# Altium PCB CM5_RP2040_MZM.PcbDoc (part 2 of 5)
Units mil, origin at the board's own origin, x right, y up, seen from the top; angles counter-clockwise.
Board outline 4724.41 x 3543.31 mil, 4 copper layers (Top Layer, GND L2, GND L3, Bottom Layer), stack 62.992 mil thick; 227 components, 122 nets, 905 pads, 3083 vias.
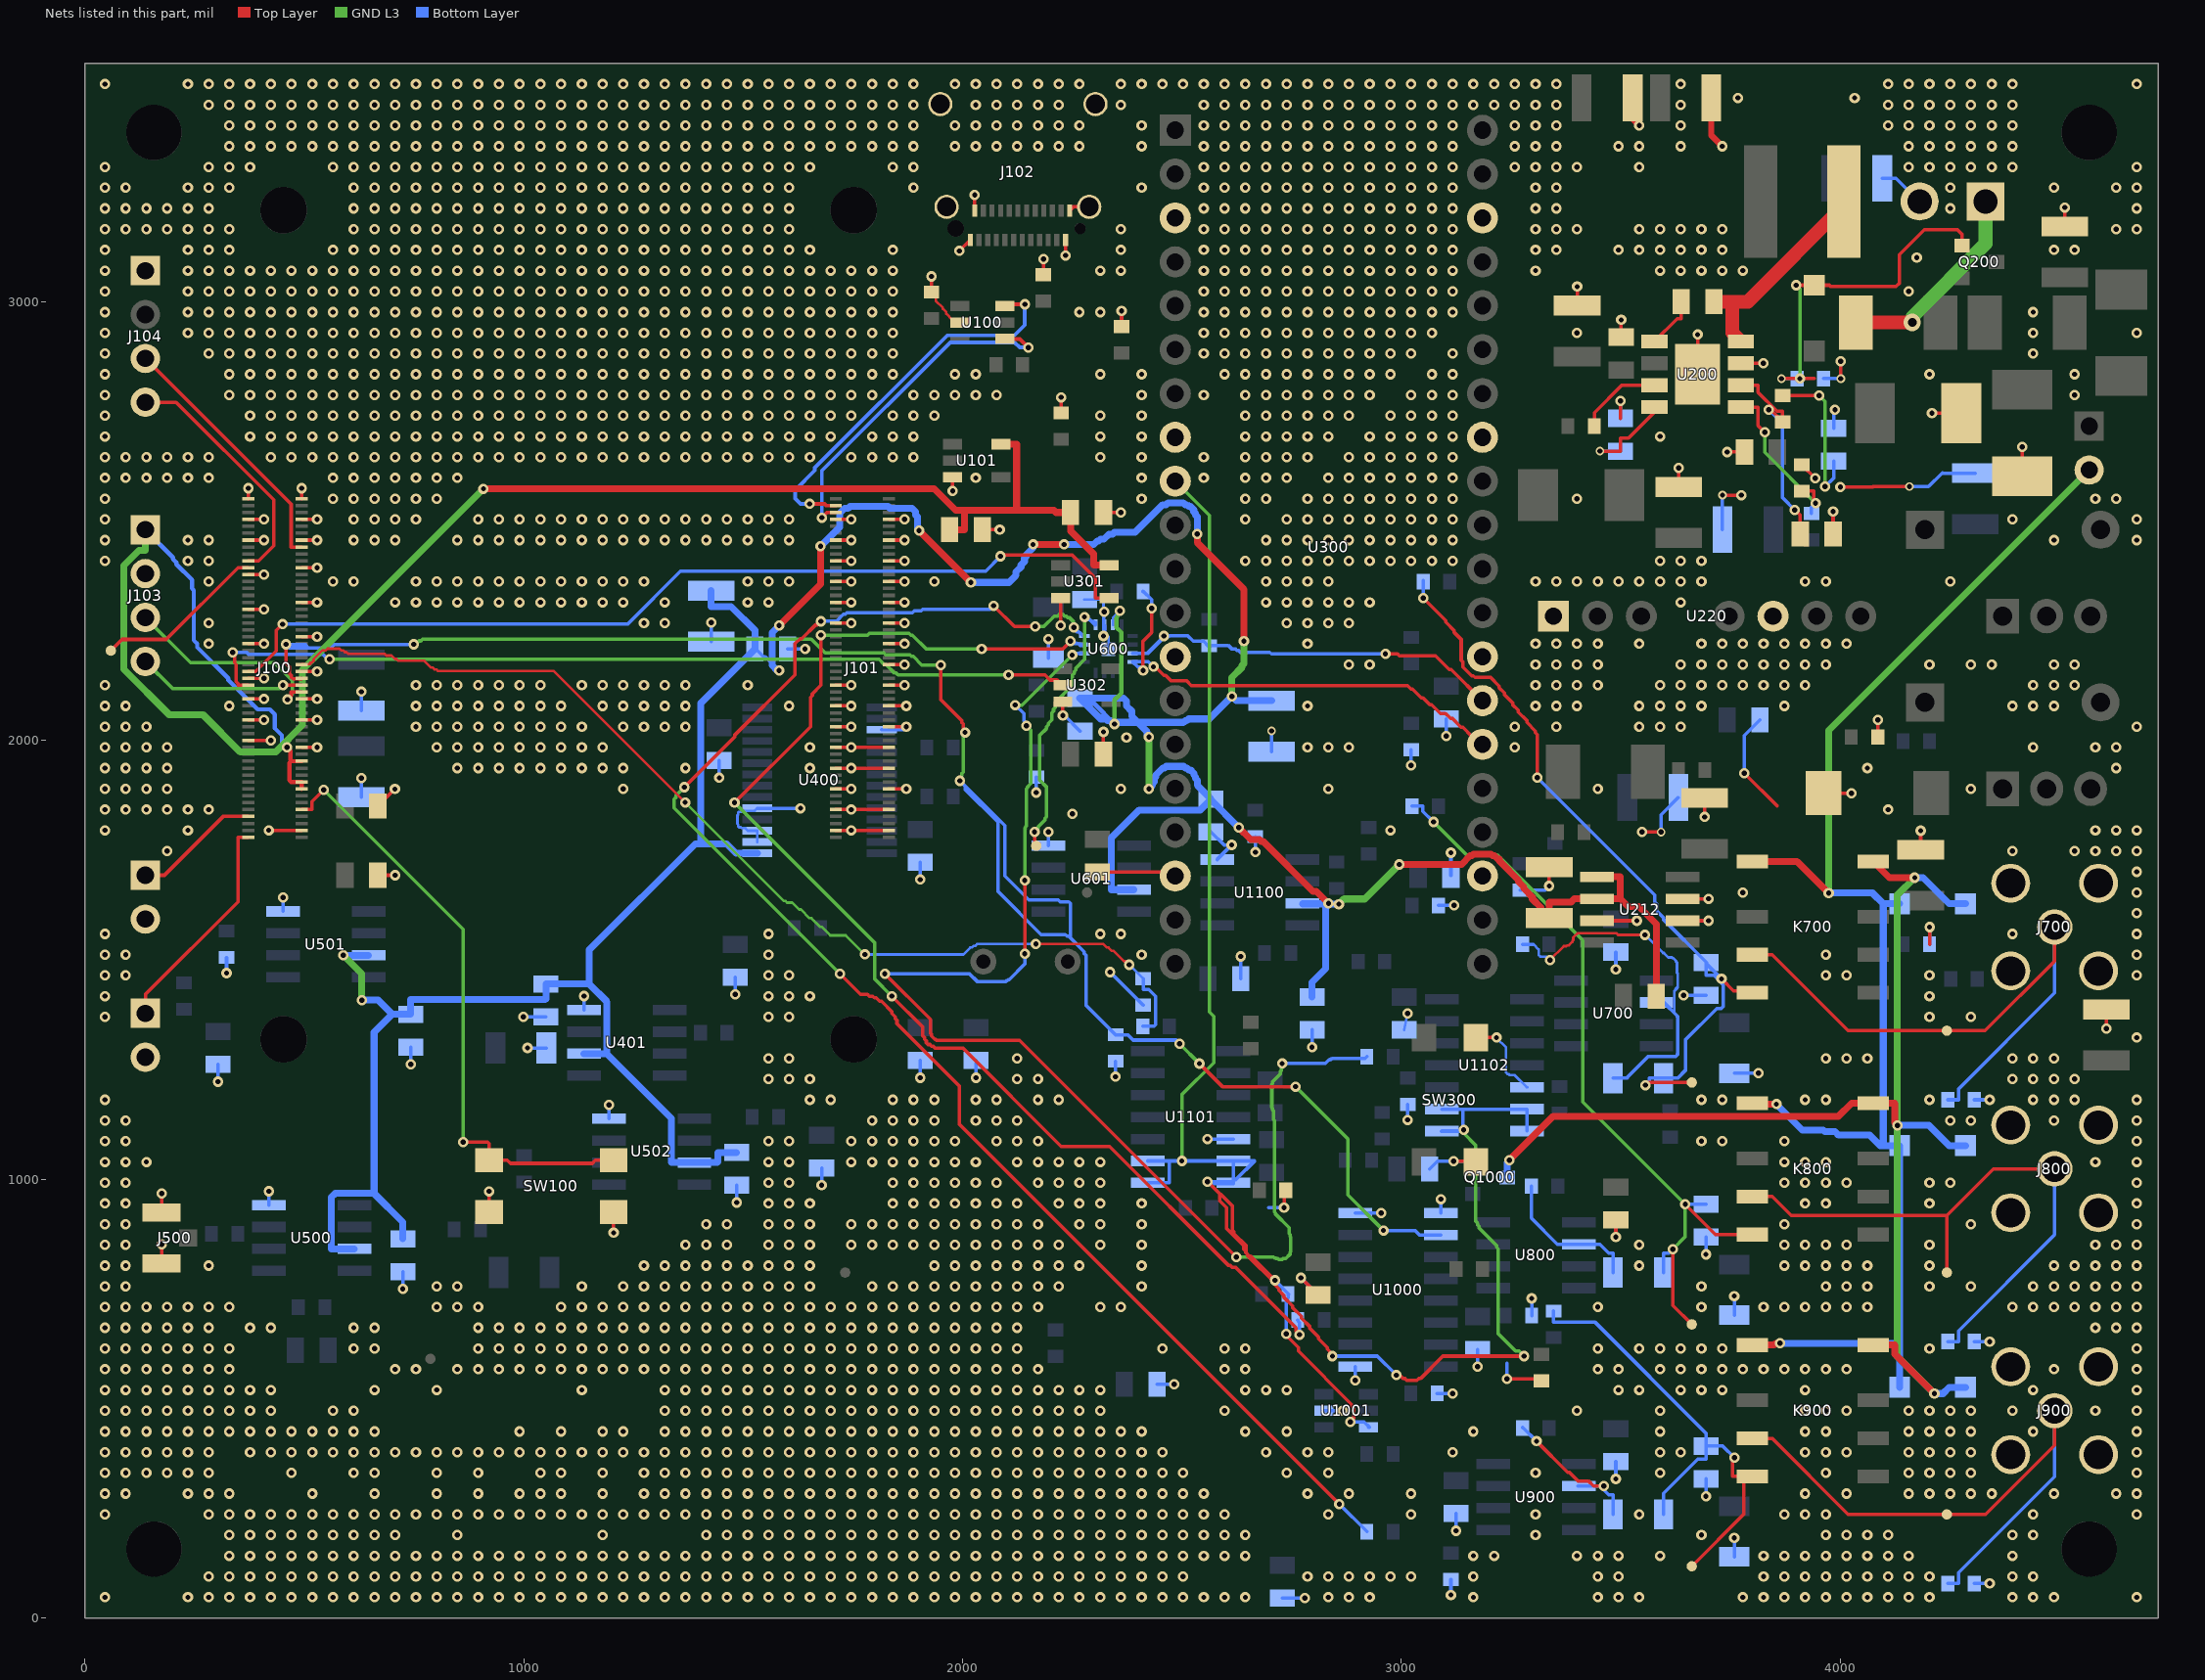
[diagram p4: the nets of this part, all layers, seen from the top]

## Via types
v1: diameter 23.62, hole 11.81, Top Layer to Bottom Layer, tented both sides, 3043 vias
v2: diameter 39.37, hole 19.68, Top Layer to Bottom Layer, tented both sides, 22 vias
v3: diameter 19.68, hole 11.81, Top Layer to Bottom Layer, tented both sides, 14 vias
v4: diameter 21.65, hole 11.81, Top Layer to Bottom Layer, tented both sides, 4 vias

## Nets (pads, with @x,y where several pads share a name; then routed paths per layer and width w, separated by ;. In a path a pad name is that pad's centre, name@x,y a point inside that pad or via, vN(x,y) a via of type N, cw(c..) or ccw(c..) an arc to the next point about the centre after c; other vN are vias at no path point) (continued)
AVDD5: C215.1 C216.2 C402.1 C403.1 C407.1 C501.1 C503.1 C506.1 C600.1 C601.1 C605.1 C1100.1 U212.1 U212.2 U400.1 U401.2 U500.7 U501.7 U502.7 U600.7 U601.7 U1100.7 | length 9522
  Top Layer w15.75: v1(1581.85,2261.81) 1676.34,2356.3 v1(1676.34,2442.91) ; v1(1900.75,2478.35) v1(2018.86,2360.24) ; v1(2160.59,2446.85) v1(2231.46,2446.85) ; v1(2534.61,2470.47) 2534.61,2450.79 2640.91,2344.49 v1(2640.91,2226.38) ; v1(2629.02,1801.77) 2656.57,1774.21 2676.26,1774.21 2680.2,1770.28 2684.13,1770.28 2798.31,1656.1 2806.18,1656.1 v1(2833.74,1628.54) ; v1(2995.08,1717.52) 3136.81,1717.52 3156.5,1737.2 3160.43,1737.2 3164.37,1741.14 3203.74,1741.14 3207.68,1737.2 3211.61,1737.2 3219.49,1729.33 3223.43,1729.33 3223.43,1725.39 3266.73,1682.09 3266.73,1678.15 3278.54,1666.34 3278.54,1662.4 3298.23,1642.72 3298.23,1638.78 3317.91,1619.09 3317.91,1615.16 3337.6,1595.47 C215.1@3336.61,1595.47 3336.61,1631.96 3386.42,1631.96 3393.63,1639.17 U212.2@3445.87,1639.17 3498.1,1639.17 ; U212.1@3445.87,1689.17 3498.1,1689.17 3498.1,1639.17 ; C216.2@3580.71,1417.32 3580.71,1581.57 3540.9,1621.38 3515.89,1621.38 3498.1,1639.17
  GND L3 w9.84: v1(2346.2,2037.4) 2346.2,2092.52 2361.95,2108.27 2361.95,2246.06 2350.14,2257.87 2350.14,2277.56 v1(2358.07,2295.28)
  GND L3 w15.75: v1(589.02,1510.43) 630.9,1468.55 v1(630.9,1408.2) ; v1(2424.53,1889.76) v1(2424.53,2007.87) ; v1(2613.35,2100.39) 2613.35,2143.7 2636.97,2167.32 2636.97,2171.26 2640.91,2175.2 v1(2640.91,2226.38) ; v1(2857.28,1626.97) 2869.09,1638.78 2916.34,1638.78 v1(2995.08,1717.52)
  Bottom Layer w5.91: U600.7@2342.32,2263.78 2342.32,2279.53 v1(2358.07,2295.28)
  Bottom Layer w7.87: C402.1@1526.73,2208.66 1526.73,2210.63 1546.42,2190.94 1550.35,2190.94 v1(1581.85,2159.45) ; C600.1@2267.46,2096.46 2266.89,2096.46 2286.57,2076.77 2290.51,2076.77 2310.2,2057.09 2314.13,2057.09 2329.88,2041.34 2333.82,2041.34 2337.76,2037.4 v1@2345.63,2037.4
  Bottom Layer w9.84: C600.1@2267.46,2096.46 2279.27,2084.65 2298.96,2084.65 v1(2346.2,2037.4)
  Bottom Layer w15.75: v1(589.02,1510.43) U501.7@646.26,1510.43 ; U500.7@613.98,841.14 561.74,841.14 561.74,958.85 570.57,967.68 659,967.68 ; v1(630.9,1408.2) 667.92,1408.2 700.13,1375.98 ; C501.1@724.41,864.17 724.41,902.28 659,967.68 ; U401.2@1137.4,1286.02 1184.19,1286.02 1189.57,1286.02 ; C403.1@1426.93,2341.54 1426.93,2305.05 1472.73,2305.05 1526.73,2251.05 1526.73,2210.64 C402.1@1526.73,2208.66 1402.95,2084.88 1402.95,1764.36 ; C506.1@1485.04,1061.02 1442.65,1061.02 1442.65,1039.63 1441.01,1037.99 U502.7@1388.78,1037.99 1336.55,1037.99 1336.55,1139.05 1189.57,1286.02 ; U400.1@1532.17,1743.11 1483.87,1743.11 1462.62,1764.36 1402.95,1764.36 ; v1(1581.85,2159.45) 1577.91,2159.45 1566.1,2171.26 1566.1,2246.06 v1(1581.85,2261.81) ; v1(1676.34,2442.91) 1719.65,2486.22 1719.65,2517.72 1731.46,2529.53 1739.33,2529.53 1743.27,2533.46 1829.88,2533.46 1833.82,2529.53 1885,2529.53 1892.87,2521.65 1892.87,2513.78 1896.81,2509.84 1896.81,2482.28 v1(1900.75,2478.35) ; v1(2018.86,2360.24) 2105.47,2360.24 2121.22,2375.98 2121.22,2383.86 2133.03,2395.67 2133.03,2399.61 2140.91,2407.48 2140.91,2415.35 2144.84,2419.29 2144.84,2423.23 2160.59,2438.98 v1(2160.59,2446.85) ; v1(2231.46,2446.85) 2298.39,2446.85 2306.26,2454.72 2310.2,2454.72 2314.13,2458.66 2322.01,2458.66 2333.82,2470.47 2341.69,2470.47 2345.63,2474.41 2392.87,2474.41 2455.87,2537.4 2463.74,2537.4 2467.68,2541.34 2503.11,2541.34 2507.05,2537.4 2510.98,2537.4 2514.92,2533.46 2518.86,2533.46 2526.73,2525.59 2526.73,2521.65 2530.67,2517.72 2530.67,2513.78 2534.61,2509.84 v1(2534.61,2470.47) ; C600.1@2266.89,2096.46 2314.13,2049.21 2325.94,2049.21 2329.88,2045.28 2337.76,2045.28 2341.69,2041.34 2503.11,2041.34 2507.05,2045.28 2510.98,2045.28 2514.92,2049.21 2562.17,2049.21 v1(2613.35,2100.39) 2622.99,2090.75 C601.1@2704.06,2090.75 ; C600.1@2267.46,2096.46 2366.7,2096.46 2373.35,2089.81 2373.35,2079.72 2373.35,2078.74 2385.16,2066.93 2385.16,2055.12 2420.59,2019.68 2420.59,2011.81 v1(2424.53,2007.87) ; U601.7@2390.55,1660.04 2338.32,1660.04 2338.32,1777.63 2402.36,1841.67 2541.55,1841.67 C605.1@2566.02,1866.14 ; v1(2424.53,1889.76) 2432.4,1897.64 2432.4,1901.57 2436.34,1905.51 2436.34,1913.39 2440.28,1917.32 2440.28,1921.26 2456.02,1937.01 2459.96,1937.01 2463.9,1940.94 2503.27,1940.94 2507.2,1937.01 2511.14,1937.01 2515.08,1933.07 2519.02,1933.07 2526.89,1925.2 2526.89,1921.26 2530.83,1917.32 2530.83,1913.39 2534.76,1909.45 2534.76,1897.64 2566.26,1866.14 C605.1@2566.02,1866.14 ; v1(2629.02,1801.77) 2566.02,1864.76 C605.1@2566.02,1866.14 ; C1100.1@2796.06,1415.35 2796.06,1448.89 2826.84,1479.66 2826.84,1628.54 U1100.7@2774.61,1628.54 ; v1(2833.74,1628.54) 2774.68,1628.54 U1100.7@2774.61,1628.54 ; v1(2857.28,1626.97) 2774.61,1626.97 U1100.7@2774.61,1628.54 ; 659,967.68 659,1334.86 700.13,1375.98 ; 700.13,1375.98 C503.1@742.52,1375.98 742.52,1409.52 1048.68,1409.52 1050.51,1411.35 C407.1@1050.51,1444.88 1149.27,1444.88 ; 1149.27,1444.88 1149.27,1522.83 1390.8,1764.36 1402.95,1764.36 ; 1149.27,1444.88 1189.63,1404.52 1189.63,1286.02 1189.57,1286.02
BIAS_F_I: C700.1 K700.4 R704.2 R1110.1 TP700.1 | length 1832.4
  Top Layer w7.87: v1(3049.41,2324.8) 3100.59,2273.62 3100.59,2269.68 3120.28,2250 3120.28,2246.06 3136.02,2230.31 3136.02,2183.07 3139.96,2179.13 3139.96,2167.32 3159.65,2147.64 3163.58,2147.64 3167.52,2143.7 3202.95,2143.7 3222.64,2124.02 3222.64,2120.08 3234.45,2108.27 3234.45,2104.33 3254.13,2084.65 3254.13,2080.71 3265.94,2068.9 3265.94,2064.96 3285.63,2045.28 3285.63,2041.34 3305.31,2021.65 3305.31,2017.72 3309.25,2013.78 v1(3309.25,1915.35) ; v1(3556.17,1214.4) 3562.24,1220.47 TP700.1@3661.42,1220.47 ; v1(3729.13,1456.69) 3756.69,1429.13 3788.19,1429.13 3792.13,1425.2 3800,1425.2 K700.4@3799.21,1425.2
  Bottom Layer w7.87: v1(3049.41,2324.8) 3049.41,2364.17 R1110.1@3049.41,2362.2 ; v1(3309.25,1915.35) 3576.97,1647.64 3576.97,1631.89 3580.91,1627.95 3580.91,1612.2 3596.65,1596.46 3596.65,1592.52 3695.08,1494.09 C700.1@3693.7,1494.09 ; v1(3556.17,1214.4) 3565.09,1223.32 3565.09,1230.31 R704.2@3597.15,1230.31 3629.2,1230.31 3646.87,1247.99 3646.87,1317.7 3718.45,1389.27 3728.68,1389.27 3733.42,1394.01 3733.42,1443.28 3712.2,1464.5 3693.7,1464.5 C700.1@3693.7,1494.09 ; v1(3729.13,1456.69) 3693.7,1492.13 C700.1@3693.7,1494.09
BIAS_F_PHI: C900.1 K900.4 R904.2 R1118.1 TP900.1 | length 1132.1
  Top Layer w7.87: TP900.1@3661.42,118.11 3779.54,236.23 K900.4@3779.54,322.83 ; v1(3758.65,365.24) 3753.87,360.46 3753.87,322.83 K900.4@3779.54,322.83 ; K900.4@3799.21,322.83 K900.4@3779.54,322.83
  Bottom Layer w7.87: R1118.1@3346.46,699.41 3346.46,674.74 3440.29,674.74 3693.7,421.33 C900.1@3693.7,391.73 ; R904.2@3597.15,236.22 3597.15,284.08 3675.2,362.14 3693.7,362.14 C900.1@3693.7,391.73 ; v1(3758.65,365.24) 3732.15,391.73 C900.1@3693.7,391.73
BIAS_F_Q: C800.1 K800.4 R804.2 R1114.1 TP800.1 | length 1821.5
  Top Layer w7.87: v1(3618.22,840.62) 3618.22,712.48 TP800.1@3661.42,669.29 ; v1(3646.52,942.88) 3715.38,874.02 K800.4@3799.21,874.02
  GND L3 w7.87: v1(3073,1814.41) 3148.33,1739.09 3218.44,1739.09 3413.01,1544.51 3413.01,1176.38 v1(3646.52,942.88) 3646.52,868.91 v1(3618.22,840.62)
  Bottom Layer w7.87: R1114.1@3024.21,1850.39 3048.89,1850.39 3048.89,1838.53 v1(3073,1814.41) ; R804.2@3597.15,787.4 3597.15,831.76 3609.37,831.76 v1(3618.22,840.62) ; v1(3646.52,942.88) 3655.21,942.88 3655.25,942.91 C800.1@3693.7,942.91
BIAS_OUT_I: J700.1 K700.3 R706.1 TP701.1 | length 1413.3
  Top Layer w7.87: K700.3@3799.21,1511.81 3844.56,1511.81 4017.78,1338.58 TP701.1@4242.52,1338.58 4330.06,1338.58 4488.19,1496.71 J700.1@4488.19,1574.8
  Bottom Layer w7.87: R706.1@4244.69,1181.1 4269.36,1181.1 4269.36,1205.78 4488.19,1424.61 J700.1@4488.19,1574.8
BIAS_OUT_PHI: J900.1 K900.3 R906.1 TP901.1 | length 1413.7
  Top Layer w7.87: K900.3@3799.21,409.45 3844.56,409.45 4017.78,236.22 TP901.1@4242.52,236.22 4330.71,236.22 4488.19,393.7 J900.1@4488.19,472.44
  Bottom Layer w7.87: R906.1@4244.69,78.74 4269.36,78.74 4269.36,103.41 4488.19,322.24 J900.1@4488.19,472.44
BIAS_OUT_Q: J800.1 K800.3 R806.1 TP801.1 | length 1389.9
  Top Layer w7.87: K800.3@3799.21,960.63 3844.56,960.63 3887.86,917.32 4242.52,917.32 ; TP801.1@4242.52,787.4 4242.52,917.32 ; J800.1@4488.19,1023.62 4348.82,1023.62 4242.52,917.32
  Bottom Layer w7.87: R806.1@4244.69,629.92 4269.36,629.92 4269.36,654.59 4488.19,873.43 J800.1@4488.19,1023.62
BUCK_BST: C204.1 U200.1 | length 120.9
  Top Layer w7.87: U200.1@3576.48,2909.65 3628.38,2961.55 3637.4,2961.55 C204.1@3637.4,3000
BUCK_COMP: C209.1 R204.1 U200.6 | length 511.1
  Top Layer w7.87: U200.6@3773.13,2809.65 3812.67,2809.65 3812.67,2793.48 3855.69,2750.46 3868.5,2750.46 R204.1@3868.5,2725.79 3868.5,2726.38 3840.94,2753.94 v1(3837.01,2753.94) ; v1(3896.06,2525.59) 3907.87,2513.78 3907.87,2470.47 C209.1@3908.66,2470.47
  Bottom Layer w7.87: v1(3837.01,2753.94) 3868.5,2722.44 3868.5,2553.15 v1(3896.06,2525.59)
BUCK_COMP_RC: C208.1 R204.2 | length 372.2
  Top Layer w7.87: R204.2@3868.5,2786.02 3896.13,2786.02 3896.52,2786.42 v1(3951.89,2786.42) ; v1(3965.31,2578.56) v1@3965.31,2587.68
  GND L3 w7.87: v1(3951.89,2786.42) 3965.31,2773 v1(3965.31,2578.56)
  Bottom Layer w7.87: v1(3965.31,2578.56) 3984.65,2597.89 C208.1@3984.65,2636.61
BUCK_EN: R201.2 U200.3 | length 193.7
  Top Layer w7.87: R201.2@3439.57,2716.54 3439.57,2747.56 3501.65,2809.65 U200.3@3576.48,2809.65
BUCK_FB: R202.2 R203.1 U200.5 | length 401.2
  Top Layer w7.87: U200.5@3773.13,2759.65 3812.67,2759.65 3812.67,2717.74 v1(3827.65,2702.76) v1@3831.18,2699.22 ; R203.1@3912.2,2568.31 3939.83,2568.31 3939.83,2544.55 v1(3943.46,2540.92)
  GND L3 w7.87: v1(3827.65,2702.76) 3827.65,2656.73 v1(3943.46,2540.92)
  Bottom Layer w7.87: R202.2@3934.25,2517.52 3934.25,2531.71 v1(3943.46,2540.92)
BUCK_SS: C203.1 U200.4 | length 237.3
  Top Layer w7.87: v3(3451.97,2659.45) 3499.21,2659.45 3499.21,2689.04 3517.34,2689.04 3576.48,2748.18 U200.4@3576.48,2759.65
  Bottom Layer w7.87: v3(3451.97,2659.45) C203.1@3499.21,2659.45
BUCK_SW: C204.2 L200.1 U200.8 | length 494.4
  Top Layer w31.5: C204.2@3712.2,3000 3753.61,3000 ; U200.8@3773.13,2909.65 3753.61,2929.17 3753.61,3000 ; L200.1@4008.27,3228.35 4008.27,3219.24 3789.03,3000 3753.61,3000
CM5_3V3: C100.1 C301.1 J100.78 J100.84 J100.86 J103.1 U101.5 U301.5 | length 4185.1
  Top Layer w9.84: v1(460.63,1984.25) 468.5,1976.38 468.5,1956.69 472.44,1952.76 492.13,1952.76 J100.78@493.7,1952.76 470.08,1952.76 466.14,1948.82 466.14,1909.45 470.08,1905.51 J100.84@493.7,1905.51 J100.86@493.7,1889.76
  Top Layer w15.75: v1(908,2573.56) 1934.87,2573.56 1983.98,2524.45 2004,2524.45 ; C100.1@1970.47,2480.31 2004,2480.31 2004,2524.45 ; U101.5@2087.6,2675.2 2123.1,2675.2 2123.1,2524.45 ; U301.5@2333.66,2399.61 2298.16,2399.61 2298.16,2425.2 2246.06,2477.3 C301.1@2246.06,2519.68 2212.53,2519.68 2207.77,2524.45 2123.1,2524.45 ; 2004,2524.45 2123.1,2524.45
  GND L3 w15.75: J103.1@137.8,2480.31 137.8,2433 123.01,2433 88.68,2398.67 88.68,2162.12 191.74,2059.06 268.74,2059.06 353.57,1974.23 435,1974.23 495.93,2035.16 495.93,2161.49 v1(908,2573.56)
  Bottom Layer w9.84: J103.1@137.8,2480.31 200.79,2417.32 200.79,2413.39 208.66,2405.51 208.66,2401.57 244.09,2366.14 244.09,2346.46 248.03,2342.52 248.03,2228.35 255.91,2220.47 255.91,2212.6 326.77,2141.73 326.77,2137.8 393.7,2070.87 421.26,2070.87 433.07,2059.06 433.07,2027.56 448.82,2011.81 448.82,1996.06 v1(460.63,1984.25)
CM5_ACT_N: J100.21 TP100.1 | length 391.7
  Top Layer w7.87: TP100.1@59.05,2204.72 84.65,2230.31 185.37,2230.31 348.75,2393.7 J100.21@372.44,2393.7
CM5_ARM_REQ: J100.50 R1010.1 R1011.1 | length 2422.5
  Top Layer w5.91: J100.50@493.7,2173.23 493.7,2173.82 513.39,2173.82 513.39,2177.76 517.32,2177.76 521.26,2181.69 521.26,2185.63 540.94,2205.31 548.82,2205.31 552.76,2209.25 580.31,2209.25 584.25,2205.31 588.19,2205.31 592.13,2201.38 596.06,2201.38 600,2197.44 682.68,2197.44 686.61,2193.5 698.43,2193.5 706.3,2185.63 710.24,2185.63 714.17,2181.69 773.23,2181.69 788.98,2165.94 792.91,2165.94 796.85,2162.01 800.79,2162.01 804.72,2158.07 1068.5,2158.07 v1(1367.72,1858.86) ; v1(2166.93,1536.02) 2320.47,1536.02 2328.35,1528.15 2332.28,1528.15 2340.16,1520.28 2344.09,1520.28 2367.72,1496.65 2371.65,1496.65 v1(2379.53,1488.78)
  GND L3 w5.91: v1(1367.72,1858.86) 1592.13,1634.45 1596.06,1634.45 1600,1630.51 1611.81,1630.51 1627.56,1614.76 1631.5,1614.76 1651.18,1595.08 1655.12,1595.08 1674.8,1575.39 1678.74,1575.39 1698.43,1555.71 1733.86,1555.71 v1(1777.17,1512.4)
  Bottom Layer w5.91: v1(1777.17,1512.4) 2001.57,1512.4 2017.32,1528.15 2021.26,1528.15 2025.2,1532.09 2029.13,1532.09 2033.07,1536.02 v1(2166.93,1536.02) ; v1(2379.53,1488.78) 2411.02,1457.28 R1010.1@2411.42,1457.28
  Bottom Layer w7.87: R1011.1@2410.83,1348.43 2435.5,1348.43 2439.3,1352.23 2439.3,1417.06 2423.75,1432.61 2411.42,1432.61 R1010.1@2411.42,1457.28
CM5_BOOT_N: J100.93 JP100.1 | length 290.1
  Top Layer w7.87: JP100.1@137.8,1692.91 181.17,1692.91 315.03,1826.77 J100.93@372.44,1826.77
CM5_FAN_PWM: J100.19 J104.4 | length 561.5
  Top Layer w7.87: J104.4@137.8,2770.87 207.87,2770.87 430.35,2548.38 430.35,2443.67 396.13,2409.45 J100.19@372.44,2409.45
CM5_FAN_TACH: J100.16 J104.3 | length 591.2
  Top Layer w7.87: J104.3@137.8,2870.87 470.01,2538.65 470.01,2440.94 J100.16@493.7,2440.94
CM5_HEARTBEAT: J100.54 R1005.1 U1000.10 | length 4690.8
  Top Layer w7.87: v1(1950.39,2171.85) 1950.39,2093.11 1997.64,2045.87 1997.64,2041.93 2001.57,2037.99 2001.57,2022.24 v1(2005.51,2018.31) ; v1(2539.56,1263.52) 2592.02,1211.06 v1(2758.33,1211.06) ; 458.27,2175.79 v1(458.27,2219.09) 458.27,2175.79 ; 458.27,2175.79 466.14,2167.91 ; 458.27,2175.79 466.14,2167.91 ; 466.14,2152.17 466.14,2167.91 ; 466.14,2152.17 470.08,2148.23 ; 466.14,2152.17 466.14,2167.91 ; 466.14,2152.17 470.08,2148.23 ; 470.08,2144.29 470.08,2148.23 ; 470.08,2144.29 474.02,2140.35 ; 470.08,2144.29 470.08,2148.23 ; 470.08,2144.29 474.02,2140.35 ; 474.02,2140.35 J100.54@493.7,2140.35 ; 474.02,2140.35 J100.54@493.7,2140.35 ; J100.54@493.7,2140.35 J100.54@493.7,2141.73 J100.54@493.7,2140.35
  GND L3 w7.87: v1(749.61,2219.09) 753.54,2219.09 761.42,2226.97 765.35,2226.97 769.29,2230.91 1655.12,2230.91 1686.61,2199.41 1820.47,2199.41 1824.41,2195.47 1879.53,2195.47 1883.46,2191.54 1887.4,2191.54 1907.09,2171.85 v1(1950.39,2171.85) ; v1(1993.7,1908.07) 1993.7,1915.94 1997.64,1919.88 1997.64,1923.82 2001.57,1927.76 2001.57,2014.37 v1(2005.51,2018.31) ; v1(2494.43,1308.65) v1(2539.56,1263.52) ; v1(2758.33,1211.06) 2877.56,1091.83 2877.56,964.6 v1(2958.89,883.27)
  Bottom Layer w7.87: v1(749.61,2219.09) 568.5,2219.09 ; v1(2494.43,1308.65) 2485.95,1317.13 2388.35,1317.13 2376.15,1329.33 R1005.1@2348.52,1329.33 ; v1(2958.89,883.27) 3031.04,883.27 3041.27,873.03 U1000.10@3089.57,873.03 ; 560.63,2211.22 568.5,2219.09 ; 560.63,2211.22 509.45,2211.22 501.57,2219.09 v1(458.27,2219.09) 466.14,2211.22 560.63,2211.22 ; 560.63,2211.22 568.5,2219.09 ; 2277.17,1514.37 2281.1,1510.43 ; 2277.17,1514.37 2277.17,1518.31 ; 2277.17,1514.37 2281.1,1510.43 ; 2277.17,1514.37 2277.17,1518.31 ; 2277.17,1518.31 2245.67,1549.8 2245.67,1628.54 2241.73,1632.48 2222.05,1632.48 2218.11,1636.42 2151.18,1636.42 2096.06,1691.54 2096.06,1805.71 v1(1993.7,1908.07) 2005.51,1896.26 2005.51,1888.39 2080.31,1813.58 2080.31,1656.1 2178.74,1557.68 2233.86,1557.68 2237.8,1553.74 2241.73,1553.74 2277.17,1518.31 ; 2281.1,1396.26 R1005.1@2348.03,1329.33 ; 2281.1,1396.26 2281.1,1510.43 ; 2281.1,1396.26 R1005.1@2348.03,1329.33 ; 2281.1,1396.26 2281.1,1510.43 ; R1005.1@2348.03,1329.33 R1005.1@2348.52,1329.33 ; R1005.1@2348.03,1329.33 R1005.1@2348.52,1329.33
CM5_PMIC_EN: J100.99 JP101.1 | length 512.6
  Top Layer w7.87: JP101.1@137.8,1377.95 137.8,1421.33 348.75,1632.28 348.75,1779.53 J100.99@372.44,1779.53
CM5_PWR_BUTTON: J100.92 SW100.1 | length 1402.5
  Top Layer w7.87: J100.92@493.7,1842.52 517.39,1842.52 517.39,1860.92 v1(544.09,1887.62) ; v1(861.75,1084.34) 917.7,1084.34 921.26,1080.78 SW100.1@921.26,1043.31 962.67,1043.31 969.81,1036.16 1156.17,1036.16 1163.32,1043.31 SW100.1@1204.72,1043.31
  GND L3 w7.87: v1(544.09,1887.62) 861.75,1569.95 v1(861.75,1084.34)
CM5_SCL: J100.56 J103.4 | length 384.9
  Top Layer w7.87: v1(451.26,2125.98) J100.56@493.7,2125.98
  GND L3 w7.87: J103.4@137.8,2180.31 200,2118.11 443.38,2118.11 v1(451.26,2125.98)
CM5_SDA: J100.58 J103.3 | length 486.6
  Top Layer w7.87: v1(461.58,2093.35) 470.01,2101.78 470.01,2110.24 J100.58@493.7,2110.24
  GND L3 w7.87: J103.3@137.8,2280.31 240.56,2177.55 431.7,2177.55 473.04,2136.2 473.04,2104.81 v1(461.58,2093.35)
CM5_UART_RX: J100.51 U301.4 | length 2165.2
  Top Layer w7.87: J100.51@372.44,2157.48 389.41,2157.48 436.06,2204.13 436.06,2250.62 v1(450.5,2265.06) ; v1(2086.56,2419.86) 2088.98,2422.28 2250.24,2422.28 2302.1,2370.42 2302.1,2324.8 U301.4@2333.66,2324.8
  Bottom Layer w7.87: v1(450.5,2265.06) 1236.31,2265.06 1357.07,2385.83 2052.53,2385.83 v1(2086.56,2419.86)
CM5_UART_TX: J100.55 U302.2 | length 2025.6
  Top Layer w7.87: v1(337.01,2200.79) 340.94,2196.85 340.94,2177.17 344.88,2173.23 344.88,2133.86 348.82,2129.92 348.82,2125.98 J100.55@372.44,2125.98 ; v1(2104.72,2149.61) 2187.4,2149.61 2199.21,2137.8 2214.96,2137.8 2226.77,2125.98 U302.2@2228.35,2125.98
  GND L3 w7.87: v1(557.48,2185.04) 1809.45,2185.04 1821.26,2173.23 1825.2,2173.23 1844.88,2153.54 1848.82,2153.54 1852.76,2149.61 v1(2104.72,2149.61)
  Bottom Layer w7.87: v1(337.01,2200.79) 368.5,2200.79 372.44,2196.85 541.73,2196.85 549.61,2188.98 553.54,2188.98 v1(557.48,2185.04)
CM5_USB_N: J101.3 U100.6 | length 895
  Top Layer w8.66: v1(1651.57,2539.37) 1685.04,2539.37 1688.98,2535.43 J101.3@1711.02,2535.43 ; U100.6@2096.46,2990.16 2100.39,2994.09 v1(2141.73,2994.09)
  Bottom Layer w8.66: v1(1651.57,2539.37) 1630.43,2539.37 1618.61,2551.18 1618.61,2570.87 1663.39,2615.64 1663.39,2621.37 1965.24,2923.23 2118.11,2923.23 2141.73,2946.85 v1(2141.73,2994.09)
CM5_USB_P: J101.5 U100.4 | length 801.6
  Top Layer w8.66: v1(1679.13,2507.87) 1690.94,2519.68 J101.5@1711.02,2519.68 ; U100.4@2096.46,2915.35 2129.92,2915.35 v1(2149.61,2895.67)
  Bottom Layer w8.66: v1(1679.13,2507.87) 1679.13,2614.85 1971.76,2907.48 2118.11,2907.48 2129.92,2895.67 v1(2149.61,2895.67)
COIL_5V: D700.1 D800.1 D900.1 K700.1 K800.1 K900.1 SW1000.2 | length 3442.3
  Top Layer w15.75: K900.1@3799.21,622.05 3848.49,622.05 3852.56,626.12 v1(3862.81,626.12) ; K800.1@3799.21,1173.23 3799.21,1175.19 3803.15,1171.25 v1(3854.33,1171.25) ; K700.1@3799.21,1724.41 3901.41,1724.41 v1(3973.47,1652.35)
  GND L3 w15.75: v1(3973.47,1652.35) 3973.47,2023.07 SW1000.2@4566.93,2616.54
  Bottom Layer w15.75: v1(3854.33,1171.25) 3913.39,1112.2 3960.63,1112.2 3964.57,1108.26 3988.19,1108.26 3996.06,1100.39 4066.93,1100.39 4090.55,1076.76 4133.86,1076.76 D800.1@4135.24,1076.76 ; v1(3862.81,626.12) 4135.24,626.12 ; v1(3973.47,1652.35) 4073.37,1652.35 4097.77,1627.94 ; D900.1@4135.24,525.58 4135.24,626.12 ; D700.1@4135.24,1627.95 4097.77,1627.94 ; 4097.77,1627.94 4097.77,1076.76 D800.1@4135.24,1076.76 ; 4135.24,626.12 D800.1@4135.24,1076.76
COIL_RETURN: D700.2 D800.2 D900.2 K700.8 K800.8 K900.8 Q1000.3 | length 2952.3
  Top Layer w15.75: v1(3245.92,1043.7) 3345.85,1143.63 3995.93,1143.63 4025.52,1173.23 K800.8@4074.8,1173.23 4124.08,1173.23 4124.08,1128.61 v1(4130.02,1122.67) ; K900.8@4074.8,622.05 4124.08,622.05 4124.08,601.78 v1(4214.3,511.56) ; K700.8@4074.8,1724.41 4111.8,1687.41 v1(4169.46,1687.41)
  GND L3 w15.75: v1(4169.46,1687.41) 4130.02,1647.96 v1(4130.02,1122.67) 4130.02,595.85 v1(4214.3,511.56)
  Bottom Layer w15.75: Q1000.3@3240.94,1003.94 3240.94,1038.73 v1(3245.92,1043.7) ; v1(4130.02,1122.67) 4201.86,1122.67 4247.77,1076.76 D800.2@4285.24,1076.76 ; v1(4169.46,1687.41) 4188.3,1687.41 4247.77,1627.94 D700.2@4285.24,1627.95 ; v1(4214.3,511.56) 4233.75,511.56 4247.77,525.58 D900.2@4285.24,525.58
DAC_CS_N: R600.2 U300.26 U600.12 | length 1128
  Top Layer w7.87: v1(2411.22,2159.45) 2411.22,2226.38 2430.91,2246.06 v1(2430.91,2301.18) ; v1(2434.84,2168.11) 2438.78,2168.11 2458.46,2148.43 2462.4,2148.43 2474.21,2136.61 2509.65,2136.61 2521.46,2124.8 3013.58,2124.8 3021.46,2116.93 3025.39,2116.93 3045.08,2097.24 3049.02,2097.24 3064.76,2081.5 3068.7,2081.5 3088.39,2061.81 3100.2,2061.81 3112.01,2050 3115.94,2050 3135.63,2030.31 3139.57,2030.31 3159.25,2010.63 3163.19,2010.63 3182.87,1990.94 U300.26@3184.65,1990.94
  Bottom Layer w7.87: 2409.32,2179.13 U600.12@2387.6,2179.13 ; v1(2411.22,2159.45) 2403.35,2167.32 2399.41,2167.32 U600.12@2387.6,2179.13 ; R600.2@2411.22,2339.57 2411.22,2340.55 2430.91,2320.87 v1(2430.91,2301.18) ; v1(2434.84,2168.11) 2423.03,2179.92 2387.6,2179.92 U600.12@2387.6,2179.13
DAC_I: R702.1 U600.2 | length 3069.5
  Top Layer w7.87: v1(1822.64,1468.5) 1926.97,1364.17 1926.97,1332.68 1928.94,1330.71 1928.94,1326.77 1936.81,1318.9 1938.78,1318.9 1940.75,1316.93 2129.72,1316.93 v1(2623.82,822.83) ; v1(2141.54,1513.78) v1(2141.54,1681.1)
  GND L3 w7.87: v1(2119.88,2080.71) 2135.63,2080.71 v1(2249.8,2194.88) ; v1(2141.54,1681.1) 2141.54,1799.21 2143.5,1801.18 2143.5,1803.15 2145.47,1805.12 2145.47,1889.76 2147.44,1891.73 2147.44,1893.7 2155.31,1901.57 2155.31,2023.62 v1(2145.47,2033.46) ; v1(2623.82,822.83) 2708.46,822.83 2710.43,820.87 2712.4,820.87 2714.37,818.9 2718.31,818.9 2720.28,816.93 2728.15,816.93 2730.12,818.9 2736.02,818.9 2745.87,828.74 2745.87,832.68 2747.83,834.65 2747.83,868.11 2745.87,870.08 2745.87,874.02 2743.9,875.98 2743.9,889.76 2712.4,921.26 2712.4,923.23 2710.43,925.2 2710.43,1133.86 2708.46,1135.83 2708.46,1155.51 2706.5,1157.48 2706.5,1161.42 2704.53,1163.39 2704.53,1216.54 2706.5,1218.5 2706.5,1222.44 2724.21,1240.16 2724.21,1246.06 2726.18,1248.03 2726.18,1251.97 2728.15,1253.94 v1(2728.15,1263.78)
  Bottom Layer w5.91: v1(2249.8,2194.88) U600.2@2277.36,2198.82
  Bottom Layer w7.87: v1(1822.64,1468.5) 2015.55,1468.5 2033.27,1450.79 2098.23,1450.79 2100.2,1452.76 2102.17,1452.76 2104.13,1454.72 2106.1,1454.72 2141.54,1490.16 v1(2141.54,1513.78) ; v1(2119.88,2080.71) 2139.57,2061.02 2139.57,2045.28 2145.47,2039.37 v1(2145.47,2033.46) ; v1(2249.8,2194.88) 2251.77,2194.88 2255.71,2198.82 U600.2@2277.36,2198.82 ; v1(2728.15,1263.78) 2826.57,1263.78 2834.45,1271.65 2836.42,1271.65 2838.39,1273.62 2840.35,1273.62 2842.32,1275.59 2917.13,1275.59 R702.1@2921.06,1279.53
DAC_LDAC_N: R601.2 U300.27 U600.11 | length 964.2
  Top Layer w7.87: v1(2963.43,2197.24) 2990.98,2197.24 2994.92,2193.31 3077.6,2193.31 3109.09,2161.81 3113.03,2161.81 3183.9,2090.94 U300.27@3184.65,2090.94
  Bottom Layer w5.91: U600.11@2387.6,2198.82 2419.09,2198.82 v1(2458.46,2238.19)
  Bottom Layer w7.87: U600.11@2387.6,2198.82 2423.03,2198.82 2458.46,2234.25 2466.34,2234.25 2470.28,2238.19 2513.58,2238.19 2525.39,2226.38 2549.02,2226.38 2560.83,2214.57 R601.2@2561.85,2215.94 2561.85,2216.93 2605.16,2216.93 2613.03,2209.06 2620.91,2209.06 2624.84,2205.12 2628.78,2205.12 2632.72,2201.18 2699.65,2201.18 2703.58,2197.24 v1(2963.43,2197.24)
DAC_PHI: R902.1 U600.4 | length 3598.5
  Top Layer w7.87: v1(1366.14,1893.7) 1480.31,2007.87 1480.31,2011.81 1618.11,2149.61 1618.11,2220.47 1629.92,2232.28 1633.86,2232.28 1665.35,2263.78 1669.29,2263.78 v1(1677.17,2271.65) ; v1(1720.47,1468.5) 1767.72,1421.26 1783.46,1421.26 1787.4,1417.32 1795.28,1417.32 1799.21,1413.39 1803.15,1413.39 1811.02,1405.51 1814.96,1405.51 1838.58,1381.89 1838.58,1377.95 1846.46,1370.08 1846.46,1366.14 1850.39,1362.2 1850.39,1354.33 1992.13,1212.6 1992.13,1125.98 v1(2858.27,259.84) ; v1(2070.87,2307.09) 2118.11,2259.84 v1(2165.35,2259.84)
  GND L3 w7.87: v1(1366.14,1893.7) 1346.46,1874.02 1346.46,1870.08 1342.52,1866.14 1342.52,1846.46 v1(1720.47,1468.5) ; v1(2165.35,2259.84) 2185.04,2259.84 2208.66,2283.46 2216.54,2283.46 2220.47,2287.4 2228.35,2287.4 2232.28,2283.46 2236.22,2283.46 2240.16,2279.53 2244.09,2279.53 2251.97,2271.65 v1@2251.97,2255.91
  Bottom Layer w5.91: v1(2253.74,2257.87) U600.4@2277.36,2238.19
  Bottom Layer w7.87: v1(1677.17,2271.65) 1712.6,2271.65 1728.35,2287.4 1732.28,2287.4 1736.22,2291.34 1885.83,2291.34 1889.76,2295.28 1905.51,2295.28 1909.45,2299.21 2062.99,2299.21 v1(2070.87,2307.09) ; v1@2251.97,2255.91 2259.84,2248.03 2263.78,2248.03 2275.59,2236.22 U600.4@2277.36,2238.19 ; v1(2858.27,259.84) 2921.26,196.85 R902.1@2921.06,196.85
DAC_Q: R802.1 U600.3 | length 3017
  Top Layer w7.87: v1(1480.31,1858.27) 1653.54,2031.5 1653.54,2098.43 1657.48,2102.36 1657.48,2106.3 1677.17,2125.98 v1(1677.17,2240.16) ; v1(1838.58,1417.32) 1909.45,1346.46 1909.45,1326.77 1913.39,1322.83 1913.39,1318.9 1917.32,1314.96 1917.32,1311.02 1921.26,1307.09 1925.2,1307.09 1929.13,1303.15 1933.07,1303.15 1937.01,1299.21 2000,1299.21 2224.41,1074.8 2334.65,1074.8 2606.3,803.15 2610.24,803.15 2614.17,799.21 2622.05,799.21 2759.84,661.42 2759.84,653.54 v1(2767.72,645.67) ; v1(2043.31,2208.66) 2228.35,2208.66 v1@2244.09,2224.41
  GND L3 w7.87: v1(1480.31,1858.27) 1799.21,1539.37 1799.21,1456.69 v1(1838.58,1417.32) ; v1(1677.17,2240.16) 1783.46,2240.16 1787.4,2244.09 1877.95,2244.09 1881.89,2240.16 1885.83,2240.16 1917.32,2208.66 v1(2043.31,2208.66)
  Bottom Layer w5.91: v1(2245.87,2226.38) U600.3@2277.36,2218.5
  Bottom Layer w7.87: v1@2244.09,2224.41 2248.03,2220.47 2263.78,2220.47 2267.72,2216.54 2275.59,2216.54 U600.3@2277.36,2218.5 ; R802.1@2763.58,679.13 2763.78,677.17 2767.72,673.23 v1(2767.72,645.67)
DAC_SPARE: TP600.1 U600.5 | length 652.5
  Top Layer w7.87: v1(2163.9,1791.34) 2163.9,1763.78 TP600.1@2167.83,1759.84
  GND L3 w7.87: v1(2163.9,1791.34) 2171.77,1799.21 2171.77,1803.15 2187.52,1818.9 2187.52,1822.83 2191.46,1826.77 2191.46,1893.7 2175.71,1909.45 2175.71,2011.81 2191.46,2027.56 2191.46,2031.5 2195.39,2035.43 2195.39,2039.37 2203.27,2047.24 2203.27,2062.99 2207.2,2066.93 2207.2,2070.87 2211.14,2074.8 2211.14,2086.61 2250.51,2125.98 2250.51,2149.61 2254.45,2153.54 2254.45,2157.48 2258.39,2161.42 2258.39,2165.35 2278.07,2185.04 v1@2278.07,2283.46
  Bottom Layer w5.91: v1(2277.6,2281.5) 2302.95,2269.68 U600.5@2302.95,2263.78
  Bottom Layer w7.87: v1@2278.07,2283.46 2285.94,2275.59 2289.88,2275.59 2301.69,2263.78 U600.5@2302.95,2263.78
DRV_I: R701.1 R704.1 U700.6 | length 1041.5
  Top Layer w5.91: v1(3338.26,1499.76) 3369.75,1531.26 3375.66,1531.26 3377.63,1533.23 3381.56,1533.23 3389.44,1541.1 3389.44,1543.07 3391.41,1545.04 3391.41,1550.94 3401.25,1560.79 3489.83,1560.79 3493.77,1556.85 v1(3554.79,1556.85)
  Bottom Layer w5.91: 3300.85,1535.43 3300.85,1535.2 3312.67,1523.39 3312.67,1511.57 3316.6,1507.64 3330.38,1507.64 v1(3338.26,1499.76) ; v1(3554.79,1556.85) 3596.13,1515.51 3598.1,1515.51 3607.94,1505.67 3615.81,1505.67 3617.78,1503.7 3619.75,1503.7 3625.66,1497.8 3625.66,1495.83 3627.63,1493.86 3627.63,1470.24 3629.59,1468.27 3629.59,1436.77 3627.63,1436.77 3627.63,1434.8 3625.66,1434.8 3625.66,1432.83 3623.69,1432.83 3623.69,1430.87 3621.72,1428.9 3621.72,1377.72 3627.63,1371.81 3627.63,1369.84 3629.59,1367.87 3629.59,1287.17 3627.63,1285.2 3627.63,1283.23 3625.66,1281.26 3623.69,1281.26 3621.72,1279.29 3561.12,1279.29
  Bottom Layer w7.87: R701.1@3276.18,1535.43 3300.85,1535.43 ; R704.1@3481.99,1230.31 3514.04,1230.31 3514.04,1232.22 3561.12,1279.29 3624.02,1279.29 3629.2,1284.47 3629.2,1371.38 3597.63,1402.95 U700.6@3580.91,1402.95
DRV_PHI: R901.1 R904.1 U900.6 | length 433.4
  Top Layer w7.87: v1(3307.68,402.95) 3378.54,332.09 3382.48,332.09 3402.17,312.4 3425.79,312.4 3437.6,300.59 v1(3461.22,300.59)
  Bottom Layer w7.87: R901.1@3276.18,433.07 3276.18,434.45 v1(3307.68,402.95) ; v1(3461.22,300.59) 3402.17,300.59 U900.6@3403.74,300.59 3452.04,300.59 3472.05,280.58 3481.99,280.58 R904.1@3481.99,236.22
DRV_Q: R801.1 R804.1 U800.6 | length 336.3
  Bottom Layer w7.87: R801.1@3295.87,984.25 3295.87,911.35 3355.44,851.77 U800.6@3403.74,851.77 3452.04,851.77 3472.05,831.76 3481.99,831.76 R804.1@3481.99,787.4
EXT_P15: F200.1 J200.1 | length 473.3
  Top Layer w31.5: F200.1@4035.24,2952.76 4095.54,2952.76 v2(4163.74,2952.76)
  GND L3 w31.5: v2(4163.74,2952.76) 4163.74,2965.24 4330.71,3132.21 J200.1@4330.71,3228.35
FAULT_N: R1004.2 U300.9 U1001.6 U1101.1 U1101.2 U1101.13 U1101.14 U1102.1 U1102.2 U1102.13 U1102.14 | length 4913.7
  Top Layer w7.87: v1(2558.07,994.09) 2585.63,966.54 2585.63,950.79 2601.38,935.04 2601.38,887.8 2640.75,848.43 2640.75,840.55 2644.68,836.61 2644.68,832.68 2652.56,824.8 2656.5,824.8 v1(2711.61,769.68) ; v1@2559.12,994.49 2614.24,939.37 2614.24,884.25 2618.18,880.31 2618.18,876.38 2645.74,848.82 2645.74,833.07 2649.67,829.13 2649.67,825.2 2712.67,762.2 2712.67,758.27 2720.54,750.39 2720.54,746.46 2732.35,734.65 2732.35,730.71 2752.04,711.02 2752.04,707.09 2771.72,687.4 2771.72,683.46 2791.41,663.78 2791.41,659.84 2811.09,640.16 2811.09,636.22 2830.78,616.54 2830.78,612.6 2842.59,600.79 v1(2842.59,596.85) ; v1(2737.6,647.64) 2741.54,643.7 2741.54,639.76 2765.16,616.14 2765.16,608.27 2887.2,486.22 2887.2,482.28 2891.14,478.35 2891.14,454.72 v1(2883.27,446.85) ; v1(2988.26,553.54) 2996.13,553.54 3004,545.67 3007.94,545.67 3011.88,541.73 3035.5,541.73 3039.44,545.67 3043.37,545.67 3094.56,596.85 v1(3279.59,596.85)
  GND L3 w7.87: U300.9@2484.65,2590.94 2562.37,2513.22 2562.37,1381.16 2572.17,1371.36 2572.17,1265.41 2499.5,1192.74 v1(2499.5,1041.73) ; v1(3141.8,1112.6) 3141.8,1104.72 3169.36,1077.17 3169.36,903.94 3173.3,900 3173.3,896.06 3177.23,892.13 3177.23,888.19 3216.6,848.82 3216.6,844.88 3220.54,840.94 3220.54,648.03 3259.91,608.66 3267.78,608.66 v1(3279.59,596.85)
  Bottom Layer w7.87: U1101.1@2422.24,991.73 2470.54,991.73 2470.54,1041.73 ; U1101.2@2422.24,1041.73 2470.54,1041.73 ; v1(2558.07,994.09) 2562.01,990.16 2617.13,990.16 U1101.14@2617.13,991.73 U1101.13@2617.13,1041.73 ; v1@2559.12,994.49 2614.24,994.49 2618.18,998.43 2622.11,998.43 2665.42,1041.73 U1101.13@2617.13,1041.73 ; v1(2711.61,769.68) 2743.11,738.19 R1004.2@2741.54,738.19 2741.54,730.31 2737.6,726.38 v1(2737.6,647.64) ; v1(2842.59,596.85) 2944.95,596.85 v1(2988.26,553.54) ; v1(2883.27,446.85) 2914.76,446.85 2926.57,435.04 U1001.6@2925.2,435.04 ; U1102.2@3091.54,1159.84 3139.83,1159.84 ; v1(3141.8,1112.6) 3137.86,1108.66 3090.62,1108.66 U1102.1@3091.54,1109.84 3139.83,1109.84 3139.83,1159.84 ; U1102.14@3286.42,1109.84 U1102.13@3286.42,1159.84 3139.83,1159.84 ; 2470.54,1041.73 v1(2499.5,1041.73) U1101.13@2617.13,1041.73
GATE_REV: D200.2 Q200.1 R200.1 | length 860.6
  Top Layer w7.87: v3(3865.94,2824.8) 3940.75,2824.8 v1(3907.81,2824.8) ; v1(3899.09,3037.6) 3907.02,3037.6 D200.2@3940.94,3037.6 3974.87,3037.6 3977.91,3034.56 4126.94,3034.56 4134.37,3041.99 4134.37,3107.08 4191.24,3163.95 4266.83,3163.95 4277.17,3153.61 Q200.1@4277.17,3127.95
  GND L3 w7.87: v1(3899.09,3037.6) 3907.81,3028.89 v1(3907.81,2824.8)
  Bottom Layer w7.87: v3(3865.94,2824.8) R200.1@3901.38,2824.8
GND: C100.2 C110.2 C111.2 C112.2 C113.2 C200.2 C201.2 C202.2 C203.2 C205.2 C206.2 C207.2 C208.2 C209.2 C210.2 C211.2 C212.2 C213.1 C214.2 C215.2 C220.2 C221.2 C222.1 C223.1 C300.2 C301.2 C302.2 C400.2 C401.2 C402.2 C403.2 C404.2 C405.2 C406.2 C407.2 C501.2 C502.2 C503.2 C505.2 C506.2 C507.2 C600.2 C601.2 C602.2 C603.2 C604.2 C605.2 C700.2 C701.2 C702.2 C800.2 C801.2 C802.2 C900.2 C901.2 C902.2 C1002.2 C1003.2 C1004.2 C1005.2 C1100.2 C1110.2 C1111.2 C1112.2 D201.2 D203.1 J100.1 J100.2 J100.7 J100.8 J100.13 J100.14 J100.22 J100.23 J100.32 J100.33 J100.42 J100.43 J100.52 J100.53 J100.59 J100.60 J100.65 J100.66 J100.71 J100.74 J100.98 J101.7 J101.8 J101.13 J101.14 J101.19 J101.20 J101.25 J101.26 J101.31 J101.32 J101.37 J101.38 J101.44 J101.50 J101.55 J101.56 J101.61 J101.62 J101.67 J101.68 J101.73 J101.74 J101.79 J101.80 J101.85 J101.86 J101.91 J101.92 J101.97 J101.98 J102.A1 J102.A12 J102.B1 J102.B12 J102.SH J103.2 J104.1 J200.2 J500.2 J700.2 J800.2 J900.2 JP100.2 JP101.2 Q1000.2 R100.2 R101.2 R103.2 R200.2 R203.2 R211.2 R213.2 R302.2 R502.2 R603.2 R703.2 R705.2 R706.2 R803.2 R805.2 R806.2 R903.2 R905.2 R906.2 R1003.2 R1005.2 R1007.2 R1010.2 R1102.2 R1104.2 R1112.2 R1116.2 R1120.2 SW100.2 SW300.2 U100.2 U101.3 U200.7 U200.9 U212.3 U212.6 U212.7 U220.1 U220.6 U300.3 U300.8 U300.13 U300.18 U300.23 U300.28 U300.33 U300.38 U301.3 U302.3 U400.2 U400.3 U400.5 U400.17 U401.4 U500.4 U501.4 U502.4 U600.6 U600.17 U601.4 U1000.1 U1000.8 U1000.9 U1001.2 U1100.4 U1101.12 U1102.12 | length 9982.6
  Top Layer w5.91: R100.2@1929.13,3022.24 1929.13,3021.65 1938.98,3011.81 1938.98,3001.97 1954.72,2986.22 1954.72,2984.25 1962.6,2976.38 1962.6,2972.44 1976.38,2958.66 1988.19,2958.66 U100.2@1994.09,2952.76
  Top Layer w7.87: J500.2@174.8,808.07 v1(174.8,851.38) ; J500.2@174.8,924.21 v1(174.8,967.52) ; J100.71@372.44,2000 v1(423.62,2000) ; J100.65@372.44,2047.24 v1(407.87,2047.24) ; J100.59@372.44,2094.49 v1(407.87,2094.49) ; J100.53@372.44,2141.73 v1(407.87,2141.73) ; J100.43@372.44,2220.47 v1(407.87,2220.47) ; J100.33@372.44,2299.21 v1(407.87,2299.21) ; J100.23@372.44,2377.95 v1(407.87,2377.95) ; J100.13@372.44,2456.69 v1(407.87,2456.69) ; J100.7@372.44,2503.94 v1(407.87,2503.94) ; J100.1@372.44,2551.18 v1(372.44,2574.8) ; v1(418.9,1795.28) J100.98@493.7,1795.28 ; J100.74@493.7,1984.25 v1(529.13,1984.25) ; J100.66@493.7,2047.24 v1(529.13,2047.24) ; J100.60@493.7,2094.49 v1(529.13,2094.49) ; J100.52@493.7,2157.48 v1(529.13,2157.48) ; J100.42@493.7,2236.22 v1(529.13,2236.22) ; J100.32@493.7,2314.96 v1(529.13,2314.96) ; J100.22@493.7,2393.7 v1(529.13,2393.7) ; J100.14@493.7,2456.69 v1(529.13,2456.69) ; J100.8@493.7,2503.94 v1(529.13,2503.94) ; J100.2@493.7,2551.18 v1(493.7,2574.8) ; C113.2@667.32,1692.91 v1(706.69,1692.91) ; C112.2@667.32,1850.39 v1(706.3,1889.37) ; SW100.2@921.26,925.2 v1(921.26,972.44) ; v1(1204.72,877.95) SW100.2@1204.72,925.2 ; J101.97@1711.02,1795.28 v1(1746.46,1795.28) J101.98@1832.28,1795.28 ; J101.91@1711.02,1842.52 v1(1746.46,1842.52) J101.92@1832.28,1842.52 ; J101.85@1711.02,1889.76 v1(1746.46,1889.76) ; J101.79@1711.02,1937.01 v1(1746.46,1937.01) J101.80@1832.28,1937.01 ; J101.73@1711.02,1984.25 v1(1746.46,1984.25) J101.74@1832.28,1984.25 ; J101.67@1711.02,2031.5 v1(1746.46,2031.5) ; J101.61@1711.02,2078.74 v1(1746.46,2078.74) ; J101.55@1711.02,2125.98 v1(1746.46,2125.98) ; J101.37@1711.02,2267.72 v1(1746.46,2267.72) ; J101.31@1711.02,2314.96 v1(1746.46,2314.96) ; J101.25@1711.02,2362.2 v1(1746.46,2362.2) ; J101.19@1711.02,2409.45 v1(1746.46,2409.45) ; J101.13@1711.02,2456.69 v1(1746.46,2456.69) ; J101.7@1711.02,2503.94 v1(1746.46,2503.94) ; J101.86@1832.28,1889.76 v1(1871.65,1889.76) ; J101.68@1832.28,2031.5 v1(1871.65,2031.5) ; J101.62@1832.28,2078.74 v1(1871.65,2078.74) ; J101.56@1832.28,2125.98 v1(1867.72,2125.98) ; J101.50@1832.28,2173.23 v1(1867.72,2173.23) ; J101.44@1832.28,2220.47 v1(1867.72,2220.47) ; J101.38@1832.28,2267.72 v1(1867.72,2267.72) ; J101.32@1832.28,2314.96 v1(1867.72,2314.96) ; J101.26@1832.28,2362.2 v1(1867.72,2362.2) ; J101.20@1832.28,2409.45 v1(1867.72,2409.45) ; J101.14@1832.28,2456.69 v1(1867.72,2456.69) ; J101.8@1832.28,2503.94 v1(1867.72,2503.94) ; R100.2@1929.13,3022.24 v1(1929.13,3057.68) ; v1(1977.36,2568.9) U101.3@1977.36,2600.39 ; v1(1992.66,3115.89) J102.A12@2017.72,3140.94 ; J102.B1@2027.56,3207.87 v1(2027.56,3243.31) ; C100.2@2045.28,2480.31 v1(2084.65,2480.31) ; R101.2@2184.05,3061.61 v1(2184.06,3097.05) ; v1(2223.43,2261.81) U301.3@2223.43,2324.8 ; R103.2@2224.41,2746.65 v1(2224.41,2782.09) ; v1(2228.35,2057.09) U302.3@2228.35,2088.58 ; v1(2234.25,3105.51) J102.A1@2234.25,3140.94 ; J102.B12@2244.09,3207.87 2252.36,3216.14 J102.SH@2288.58,3216.14 ; C604.2@2306.85,1700.39 2475.2,1700.39 U300.18@2484.65,1690.94 ; C302.2@2320.87,1968.5 v1(2320.87,2019.68) ; C301.2@2320.87,2519.68 v1(2360.24,2519.68) ; R302.2@2362.2,2943.5 v1(2362.2,2978.94) ; v1(2732.48,935.04) 2732.48,970.47 R1104.2@2736.42,974.41 ; v1(2770.87,775.2) C1112.2@2809.84,736.22 ; v1(3118.9,1041.34) 3167.32,1041.34 SW300.2@3169.29,1039.37 ; SW300.2@3169.29,1322.83 v1(3216.54,1322.83) ; v1(3240.55,544.68) 3315.35,544.68 R803.2@3319.29,540.75 ; v1(3336.61,1668.31) C215.2@3336.61,1711.61 ; C201.2@3400.39,2991.14 v1(3400.39,3034.45) ; U212.3@3445.87,1589.17 v1(3536.42,1589.17) ; v1(3488.39,868.11) C801.2@3488.39,907.48 ; C202.2@3500.59,2919.29 v1(3500.59,2958.66) ; v1(3548.23,1791.34) v3(3591.54,1791.34) ; C300.2@3631.89,2577.76 v1(3631.89,2621.06) ; U212.6@3640.75,1589.17 v1(3699.8,1589.17) ; U212.7@3640.75,1639.17 v1(3699.8,1639.17) ; U200.9@3674.8,2834.65 v1(3674.8,2925.2) ; v1(3690.94,1825.79) C214.2@3690.94,1869.09 ; v3(3731.3,2559.06) v1(3774.61,2559.06) ; v1(3742.13,2657.48) C223.1@3781.5,2657.48 ; U200.7@3773.13,2859.65 v1(3824.31,2859.65) ; R203.2@3912.2,2628.54 v1(3942.83,2597.92) ; C213.1@3962.11,1879.92 v1(4025.1,1879.92) ; C209.2@3983.46,2470.47 v1(3983.46,2521.65) ; v1(4000,2577.76) 4074.8,2577.76 4074.8,2578.74 v3(4157.48,2578.74) ; v3(4000.98,2824.8) v1(4000.98,2864.17) ; R211.2@4085.24,2007.87 v1(4085.24,2047.24) ; C211.2@4183.07,1750.98 v1(4183.07,1794.29) ; v1(4208.66,2746.25) D201.2@4275.59,2746.25 ; D203.1@4414.38,2602.36 v1(4414.38,2669.29) ; C200.2@4511.42,3171.46 v1(4511.42,3214.76) ; v1(4606.3,1343.5) C212.2@4606.3,1386.81 ; 3499.21,2734.25 v1(3499.21,2773.62) 3499.21,2734.25 ; v1(3781.13,1925.56) 3856.3,1850.39 v1(3781.13,1925.56) ; 4203.35,1535.43 v1(4203.35,1574.8) 4203.35,1535.43
  Top Layer w14.17: C207.2@3526.57,3464.57 3526.57,3416.73 v1(3541.73,3401.57) ; C206.2@3705.71,3464.57 3705.71,3379.33 v1(3730.71,3354.33)
  Bottom Layer w5.91: U400.2@1532.17,1768.7 U400.3@1532.17,1794.29 1510.51,1794.29 1504.61,1800.2 1496.73,1800.2 1494.76,1802.17 1490.83,1802.17 1488.86,1804.13 1488.86,1808.07 1486.89,1810.04 1486.89,1829.72 1488.86,1831.69 1488.86,1835.63 1490.83,1837.6 1494.76,1837.6 1496.73,1839.57 1526.26,1839.57 U400.5@1532.17,1845.47 ; C602.2@2277.6,2320.87 2320.91,2320.87 v1(2320.91,2238.19) ; v1(2322.83,2293.31) U600.6@2322.64,2263.78 2324.61,2261.81 2324.61,2244.09 2332.48,2236.22 U600.17@2332.48,2208.66 ; C702.2@3006.1,1340.55 v1(3013.98,1377.95) ; v1(3216.54,1322.83) 3216.54,1322.05 3238.19,1300.39 3238.19,1243.31 3242.13,1239.37 3244.09,1239.37 3246.06,1237.4 3257.87,1237.4 3285.43,1209.84 U1102.12@3286.42,1209.84
  Bottom Layer w7.87: v1(303.15,1222.44) C502.2@303.15,1261.81 ; v1(322.83,1469.88) R502.2@322.83,1505.32 ; U500.4@419.09,941.14 v1(419.09,972.64) ; U501.4@451.38,1610.43 v1(451.38,1641.93) ; C110.2@629.92,1871.06 v1(629.92,1914.37) ; C111.2@629.92,2067.91 v1(629.92,2111.22) ; v1(724.41,750) C501.2@724.41,789.37 ; v1(742.52,1261.81) C503.2@742.52,1301.18 ; v1(999.33,1370.08) C407.2@1050.51,1370.08 ; v1(1008.46,1299.21) C505.2@1051.77,1299.21 ; U401.4@1137.4,1386.02 v1(1137.4,1417.52) ; U502.4@1193.9,1137.99 v1(1193.9,1169.49) ; C403.2@1426.93,2225.39 v1(1426.93,2268.7) ; v1(1445.45,1914.96) C401.2@1445.45,1954.33 ; v1(1481.81,1421.26) C400.2@1481.81,1460.63 ; v1(1485.04,946.85) C506.2@1485.04,986.22 ; U400.5@1532.17,1845.47 v1(1630.59,1845.47) ; C402.2@1601.54,2208.66 v1(1640.91,2208.66) ; v1(1678.74,986.22) C507.2@1678.74,1025.59 ; U400.17@1815.63,2024.61 1864.76,2024.61 v1(1871.65,2031.5) ; v1(1903.27,1231.3) C405.2@1903.27,1270.67 ; v1(1903.27,1683.07) C404.2@1903.27,1722.44 ; v1(2030.63,1231.3) C406.2@2030.63,1270.67 ; v1(2167.83,1881.3) R603.2@2167.83,1916.73 ; C603.2@2195.28,2187.99 v1(2195.28,2231.3) ; U601.4@2195.67,1760.04 v1(2195.67,1791.54) ; v1(2228.35,2057.09) 2232.03,2057.09 C600.2@2267.46,2021.65 ; v1(2336.25,1472.21) R1010.2@2411.42,1397.05 ; v1(2348.52,1233.66) R1005.2@2348.52,1269.09 ; C1003.2@2442.91,532.48 v1(2482.28,532.48) ; v1(2558.07,1091.73) U1101.12@2617.13,1091.73 ; C605.2@2566.02,1791.34 2595.41,1761.95 v1(2613.13,1761.95) U1100.4@2579.72,1728.54 ; C1002.2@2633.86,1456.69 v1(2633.86,1507.87) ; v1(2666.93,1745.47) R1102.2@2666.93,1780.91 ; C601.2@2704.06,1974.61 v3(2704.06,2021.85) ; C1004.2@2728.35,45.28 v1(2779.53,45.28) ; v1(2796.06,1301.18) C1100.2@2796.06,1340.55 ; U1001.2@2822.83,472.44 v1(2866.14,472.44) ; v1(2894.68,541.54) U1000.1@2894.68,573.03 ; U1000.8@2894.68,923.03 v1(2953.74,923.03) ; v1(3014.17,1135.24) R703.2@3014.17,1170.67 ; v1(3022.05,1943.31) R1112.2@3022.05,1978.74 ; C1005.2@3064.27,1023.62 3081.99,1041.34 v1(3118.9,1041.34) Q1000.2@3162.2,1041.34 ; R1003.2@3081.3,511.81 v1(3116.73,511.81) ; R1116.2@3084.45,1624.02 v1(3119.88,1624.02) ; U1000.9@3089.57,923.03 v1(3089.57,954.53) ; v1(3101.97,2009.84) C1110.2@3101.97,2049.21 ; v1(3112.6,52.56) R903.2@3112.6,87.99 ; C1111.2@3112.6,1692.91 v1(3112.6,1744.09) ; v1(3124.21,198.82) C902.2@3124.21,238.19 ; v1(3173.43,572.83) C802.2@3173.43,612.2 ; R1007.2@3270.87,1658.86 3327.17,1658.86 v1(3336.61,1668.31) ; R1120.2@3296.65,688.98 v1(3296.65,728.35) ; v1(3488.39,316.93) C901.2@3488.39,356.3 ; v1(3488.39,1478.35) C701.2@3488.39,1517.72 ; C203.2@3499.21,2734.25 v1(3499.21,2773.62) ; v3(3591.54,1791.34) 3591.54,1830.71 C220.2@3630.91,1870.08 ; v1(3642.52,1419.29) C700.2@3693.7,1419.29 ; v1(3693.7,277.56) C900.2@3693.7,316.93 ; v1(3693.7,828.74) C800.2@3693.7,868.11 ; C222.1@3731.3,2480.31 v3(3731.3,2559.06) ; R905.2@3758.27,139.27 v1(3758.27,182.58) ; R805.2@3758.27,690.45 v1(3758.27,733.76) ; R705.2@3758.27,1241.63 v1(3813.39,1241.63) ; v1(3781.13,1925.56) 3781.13,2011.45 C221.2@3816.93,2047.24 ; R200.2@3961.61,2824.8 v3(4000.98,2824.8) ; C208.2@3984.65,2711.42 3984.65,2750.79 v1(3987.8,2753.94) ; C205.2@4095.47,3281.5 4126.97,3281.5 4205.71,3202.76 4205.71,3203.35 J200.2@4180.71,3228.35 ; v3(4157.48,2578.74) 4200.79,2578.74 4232.28,2610.24 4232.28,2609.25 C210.2@4307.09,2609.25 ; R213.2@4203.35,1535.43 v1(4203.35,1574.8) ; R906.2@4304.92,78.74 v1(4340.35,78.74) ; R806.2@4304.92,629.92 v1(4340.35,629.92) ; R706.2@4304.92,1181.1 v1(4340.35,1181.1) ; 2697.05,935.04 v1(2732.48,935.04) 2697.05,935.04 ; v1(2770.87,775.2) 2809.84,736.22 v1(2770.87,775.2) ; v1(3240.55,544.68) 3240.55,580.12 v1(3240.55,544.68) ; v1(3488.39,868.11) 3488.39,907.48 v1(3488.39,868.11)